# Altium PCB Sound_Sensor.PcbDoc (part 6 of 6)
Units mm, origin at the board's own origin, x right, y up, seen from the top; angles counter-clockwise.
Board outline 90.25 x 88.01 mm, 2 copper layers (Top Layer, Bottom Layer), stack 1.448 mm thick; 369 components, 272 nets, 1045 pads, 508 vias.
Unrouted connection lines stored in the file: 15.
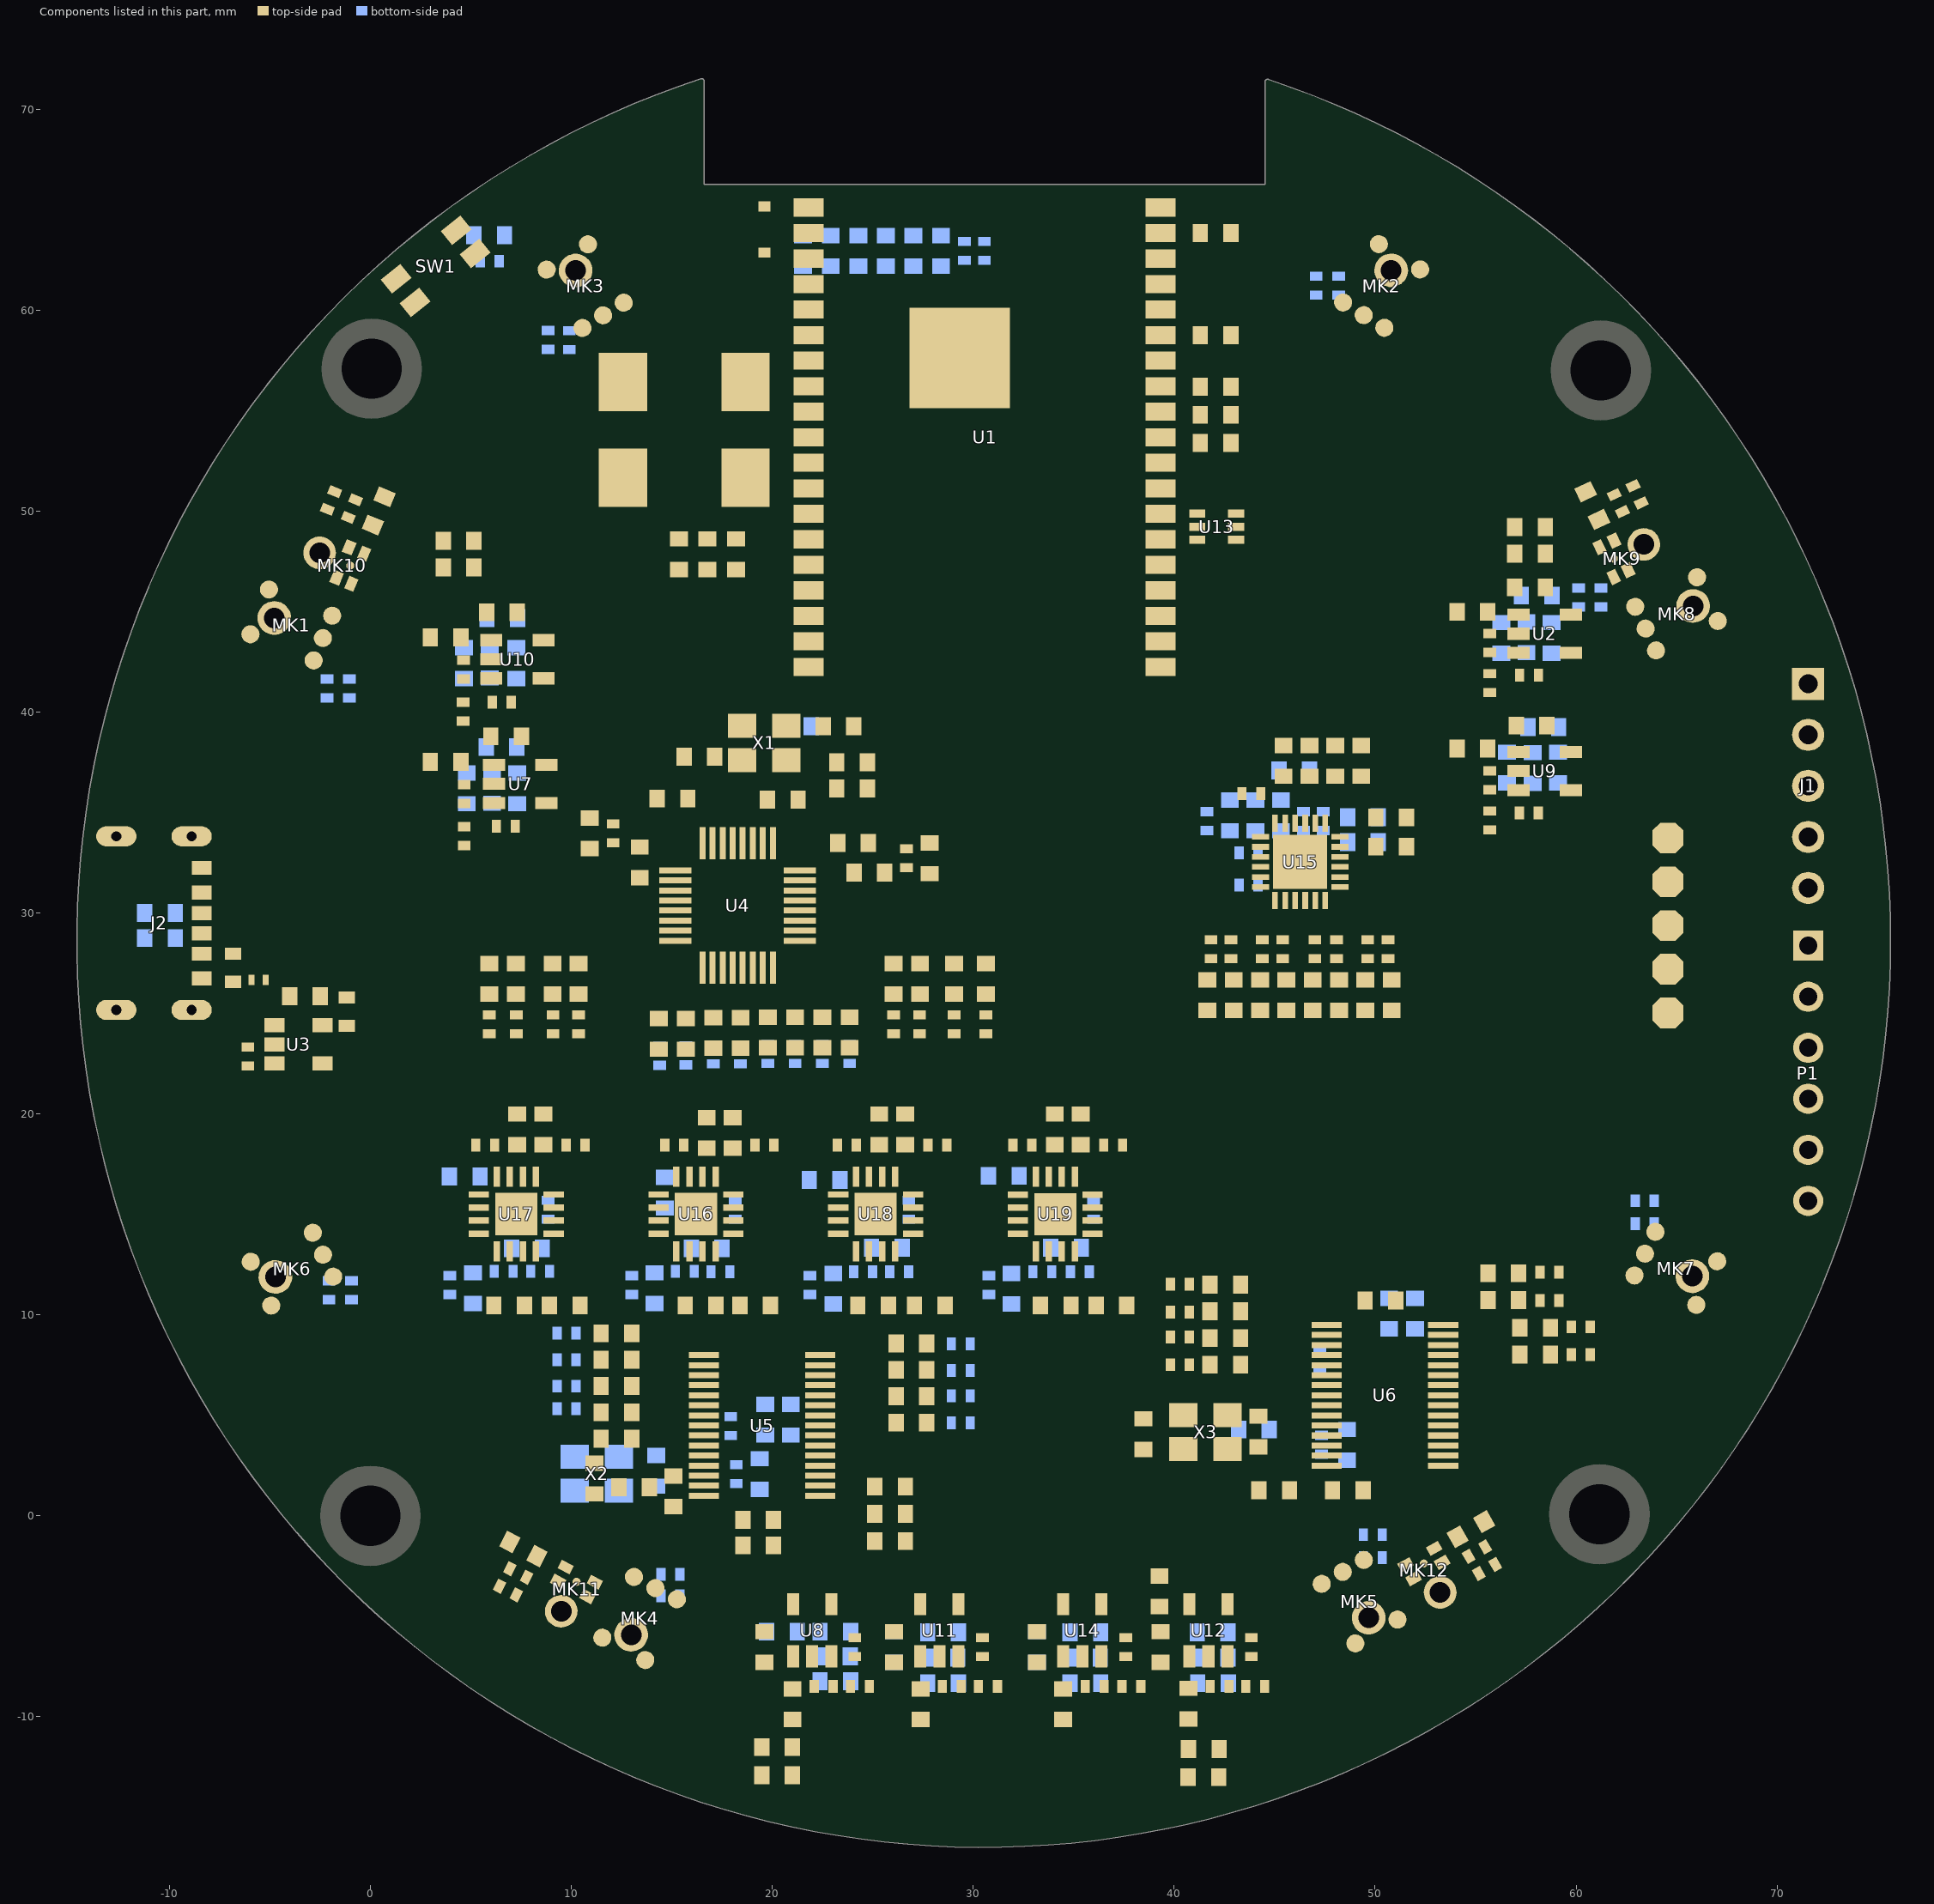
[diagram p5: the components of this part, seen from the top]

## Silkscreen, mask and mechanical layers (free items; w line width, h text height) (continued)
Drill Drawing:
  lines w0.254: -40.836,113.537 -39.142,113.537 -39.142,115.23 -40.836,115.23 -40.836,113.537 ; -40.836,117.77 -40.412,117.77 -40.412,117.347 -39.566,117.347 -39.566,117.77 -39.142,117.77 -39.142,118.617 -39.566,118.617 -39.566,119.04 -40.412,119.04 -40.412,118.617 -40.836,118.617 -40.836,117.77 ; -40.836,121.157 -40.836,121.58 -40.412,122.003 -40.836,122.427 -40.836,122.85 -40.412,122.85 -39.989,122.427 -39.566,122.85 -39.142,122.85 -39.142,122.427 -39.566,122.003 -39.142,121.58 -39.142,121.157 -39.566,121.157 -39.989,121.58 -40.412,121.157 -40.836,121.157 ; -40.836,124.967 -39.989,125.39 -39.142,124.967 -39.566,125.813 -39.142,126.66 -39.989,126.237 -40.836,126.66 -40.412,125.813 -40.836,124.967 ; -40.836,129.623 -39.989,128.777 -39.142,129.623 -39.989,130.47 -40.836,129.623 ; -40.836,134.28 -39.142,134.28 -39.989,132.587 -40.836,134.28
  lines w0.381: -42.354,112.394 198.371,112.394 ; -42.354,135.254 198.371,135.254 ; -28.362,108.584 -28.362,139.064 ; -13.126,108.584 -13.126,139.064 ; 15.313,108.584 15.313,139.064 ; 28.163,108.584 28.163,139.064 ; 46.801,108.584 46.801,139.064 ; 84.89,108.584 84.89,139.064 ; 99.872,108.584 99.872,139.064 ; 118.815,108.584 118.815,139.064 ; 135.321,108.584 135.321,139.064 ; 162.745,108.584 162.745,139.064 ; -42.354,108.584 198.371,108.584 198.371,139.064 -42.354,139.064 -42.354,108.584
  text "Symbol" at -40.068,136.397 h1.83
  text "Count" at -27.219,136.397 h1.83
  text "Hole Size" at -11.983,136.397 h1.83
  text "Plated" at 16.456,136.397 h1.83
  text "Hole Type" at 29.306,136.397 h1.83
  text "Drill Layer Pair" at 47.944,136.397 h1.83
  text "Via/Pad" at 86.033,136.397 h1.83
  text "Pad Shape" at 101.015,136.397 h1.83
  text "Template" at 119.958,136.397 h1.83
  text "Hole Length" at 136.464,136.397 h1.83
  text "Routed Path Length" at 163.888,136.397 h1.83
  text "508" at -27.219,132.587 h1.52
  text "11.81mil (0.300mm)" at -11.983,132.587 h1.52
  text "PTH" at 16.456,132.587 h1.52
  text "Round" at 29.306,132.587 h1.52
  text "Top Layer - Bottom Layer" at 47.944,132.587 h1.52
  text "Via" at 86.033,132.587 h1.52
  text "Rounded" at 101.015,132.587 h1.52
  text "v60h30" at 119.958,132.587 h1.52
  text "-" at 136.464,132.587 h1.52
  text "-" at 163.888,132.587 h1.52
  text "6" at -27.219,128.777 h1.52
  text "35.43mil (0.900mm)" at -11.983,128.777 h1.52
  text "PTH" at 16.456,128.777 h1.52
  text "Round" at 29.306,128.777 h1.52
  text "Top Layer - Bottom Layer" at 47.944,128.777 h1.52
  text "Pad" at 86.033,128.777 h1.52
  text "(Mixed)" at 101.015,128.777 h1.52
  text "(Mixed)" at 119.958,128.777 h1.52
  text "-" at 136.464,128.777 h1.52
  text "-" at 163.888,128.777 h1.52
  text "5" at -27.219,124.967 h1.52
  text "37.40mil (0.950mm)" at -11.983,124.967 h1.52
  text "PTH" at 16.456,124.967 h1.52
  text "Round" at 29.306,124.967 h1.52
  text "Top Layer - Bottom Layer" at 47.944,124.967 h1.52
  text "Pad" at 86.033,124.967 h1.52
  text "(Mixed)" at 101.015,124.967 h1.52
  text "(Mixed)" at 119.958,124.967 h1.52
  text "-" at 136.464,124.967 h1.52
  text "-" at 163.888,124.967 h1.52
  text "12" at -27.219,121.157 h1.52
  text "40.35mil (1.025mm)" at -11.983,121.157 h1.52
  text "PTH" at 16.456,121.157 h1.52
  text "Round" at 29.306,121.157 h1.52
  text "Top Layer - Bottom Layer" at 47.944,121.157 h1.52
  text "Pad" at 86.033,121.157 h1.52
  text "Rounded" at 101.015,121.157 h1.52
  text "(Mixed)" at 119.958,121.157 h1.52
  text "-" at 136.464,121.157 h1.52
  text "-" at 163.888,121.157 h1.52
  text "4" at -27.219,117.347 h1.52
  text "118.11mil (3.000mm)" at -11.983,117.347 h1.52
  text "PTH" at 16.456,117.347 h1.52
  text "Round" at 29.306,117.347 h1.52
  text "Top Layer - Bottom Layer" at 47.944,117.347 h1.52
  text "Pad" at 86.033,117.347 h1.52
  text "Rounded" at 101.015,117.347 h1.52
  text "c500h300" at 119.958,117.347 h1.52
  text "-" at 136.464,117.347 h1.52
  text "-" at 163.888,117.347 h1.52
  text "4" at -27.219,113.537 h1.52
  text "19.69mil (0.500mm)" at -11.983,113.537 h1.52
  text "PTH" at 16.456,113.537 h1.52
  text "Slot" at 29.306,113.537 h1.52
  text "Top Layer - Bottom Layer" at 47.944,113.537 h1.52
  text "Pad" at 86.033,113.537 h1.52
  text "Rounded" at 101.015,113.537 h1.52
  text "(Mixed)" at 119.958,113.537 h1.52
  text "55.12mil (1.400mm)" at 136.464,113.537 h1.52
  text "35.43mil (0.900mm)" at 163.888,113.537 h1.52
  text "539 Total" at -27.219,109.727 h1.52
  text "Slot definitions :" at -40.068,106.044 h1.52
  text "Routed Path Length" at -13.838,106.044 h1.52
  text "= Calculated from tool start centre position to tool end centre position." at 14.17,106.044 h1.52
  text "Hole Length" at -13.838,103.505 h1.52
  text "= Routed Path Length + Tool Size = Slot length as defined in the PCB layout" at 3.759,103.505 h1.52

## Text inside footprints (layer, text, board x,y; h text height)
J2: Top Overlay "Board Edge" at -11.405,33.2 h0.76 r270